# Altium PCB NB3000XN.PcbDoc (part 29 of 71)
Units mil, origin at the board's own origin, x right, y up, seen from the top; angles counter-clockwise.
Board outline 9527.56 x 6929.77 mil, 6 copper layers (Top Layer, GND+SHIELD, MidLayer1, MidLayer2, P2 - 3V3+5V0, Bottom Layer), stack 62.375 mil thick; 832 components, 1027 nets, 4655 pads, 4981 vias.
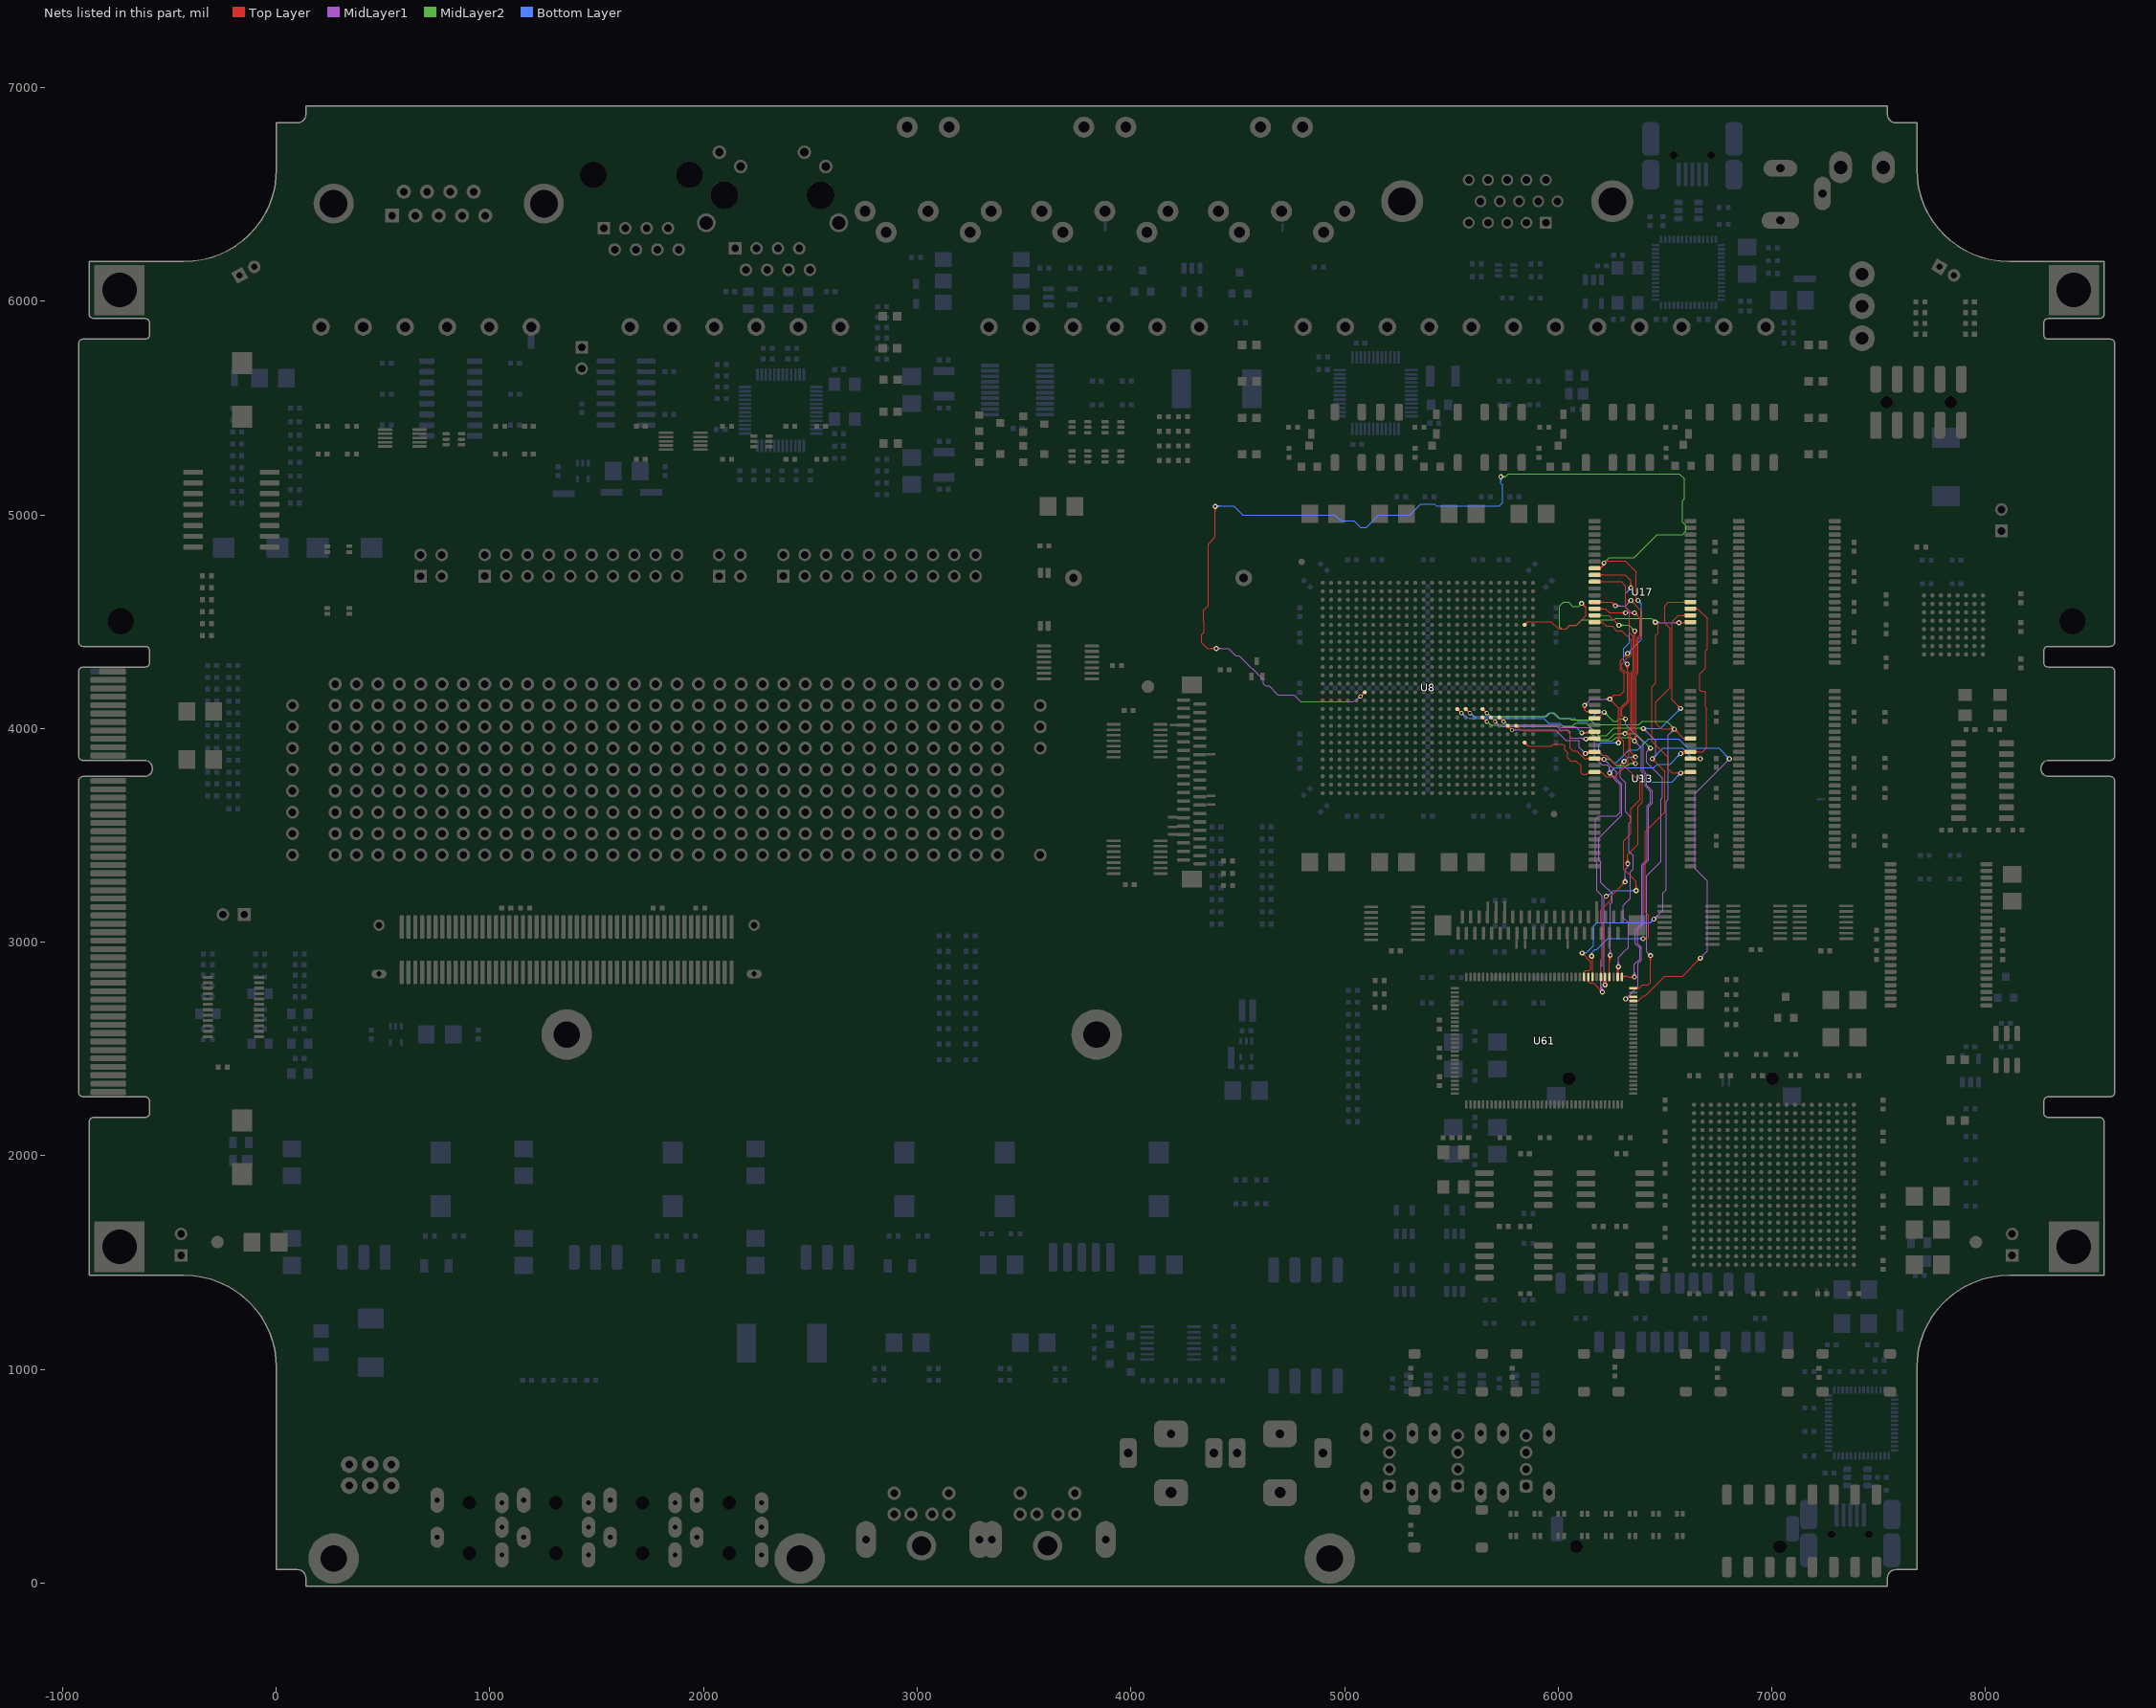
[diagram p33: the nets of this part, all layers, seen from the top]

## Via types
v1: diameter 23, hole 11.81, Top Layer to Bottom Layer, 3672 vias
v2: diameter 26, hole 11.81, Top Layer to Bottom Layer, 461 vias
v3: diameter 19, hole 11.81, Top Layer to Bottom Layer, tented both sides, 396 vias
v4: diameter 23.62, hole 11.81, Top Layer to Bottom Layer, 288 vias
v5: diameter 20, hole 11.81, Top Layer to Bottom Layer, 91 vias
v6: diameter 23, hole 11.81, Top Layer to Bottom Layer, tented both sides, 50 vias
v7: diameter 31, hole 11.81, Top Layer to Bottom Layer, 15 vias
v8: diameter 27.56, hole 11.81, Top Layer to Bottom Layer, tented both sides, 4 vias
v9: diameter 29, hole 11.81, Top Layer to Bottom Layer, 3 vias
v10: diameter 21, hole 11.81, Top Layer to Bottom Layer, 1 vias

## Nets (pads, with @x,y where several pads share a name; then routed paths per layer and width w, separated by ;. In a path a pad name is that pad's centre, name@x,y a point inside that pad or via, vN(x,y) a via of type N, cw(c..) or ccw(c..) an arc to the next point about the centre after c; other vN are vias at no path point) (continued)
DB_MEM.BUS_D17: U8.P6 U13.4 U17.8 U61.61 | length 9838.7
  Top Layer w4: v1@4388.28,5033.28 cw(c4372.06,5017.06) 4395,5017.06 cw(c4417.93,5017.06) v1@4401.72,5033.28 ; v1@4391.11,5036.11 cw(c4381.72,5026.72) 4395,5026.72 cw(c4408.28,5026.72) v1@4398.89,5036.11 ; v4@4393.06,4368.1 ccw(c4376.31,4351.35) 4376.31,4375.04 ccw(c4376.31,4398.73) v4@4393.06,4381.98 ; v1(4395,5040) 4395,4896.1 4362.02,4863.13 4362.02,4577.02 4340,4555 4340,4500.59 4343,4497.59 4343,4451.2 4332.02,4440.23 4332.02,4401.13 4358.11,4375.04 v4(4400,4375.04) ; v4@4395.89,4370.93 ccw(c4385.97,4361.01) 4385.97,4375.04 ccw(c4385.97,4389.07) v4@4395.89,4379.15 ; v3(5075.04,4150.63) U8.P6@5094.72,4170.31 ; U8.P6@5087.22,4170.31 cw(c5069.12,4170.31) 5081.92,4157.51 cw(c5094.72,4144.71) U8.P6@5094.72,4162.81 ; U8.P6@5087.38,4170.31 cw(c5069.66,4170.31) 5082.19,4157.78 cw(c5094.72,4145.25) U8.P6@5094.72,4162.97 ; v1@6117.62,4101.27 cw(c6107.92,4089.04) 6123.52,4089.04 ; v1(6123.52,4108.71) 6123.52,4089.04 ; v1@6129.43,4101.27 ccw(c6139.13,4089.04) 6123.52,4089.04 ; U13.4@6147.37,4074.3 ccw(c6133.72,4060.65) 6133.72,4079.96 ccw(c6133.72,4099.27) U13.4@6147.37,4085.62 ; U13.4@6170.59,4079.96 6132.6,4079.96 6123.52,4089.04 ; U17.8@6170.59,4750.24 6199.72,4750.24 ; U17.8@6187.19,4746.35 ccw(c6190.23,4758.62) 6199.17,4749.68 ; U17.8@6188.15,4750.24 ccw(c6192.22,4766.65) 6204.17,4754.69 ; U17.8@6189.11,4754.12 ccw(c6194.21,4774.67) 6209.18,4759.7 ; U17.8@6190.07,4758 ccw(c6196.2,4782.7) v1@6214.19,4764.71 ; U17.8@6195.63,4747.41 cw(c6199.72,4745.87) 6199.72,4750.24 ; U17.8@6195.63,4753.06 ccw(c6199.72,4754.6) 6199.72,4750.24 ; 6204.89,4755.4 ccw(c6196.85,4763.44) v1@6206.29,4769.76 ; 6208.33,4758.85 ccw(c6200.98,4766.2) v1@6209.62,4771.98 ; 6211.77,4762.29 ccw(c6205.1,4768.96) v1@6212.94,4774.21 ; v1@6241.52,4128.21 cw(c6241.52,4105.27) 6257.74,4121.49 cw(c6273.96,4137.71) 6251.02,4137.71 cw(c6273.96,4137.71) 6257.74,4153.93 cw(c6241.52,4170.14) v1@6241.52,4147.21 ; v1@6241.52,4132.21 cw(c6241.52,4118.93) 6250.91,4128.32 cw(c6260.3,4137.71) 6247.02,4137.71 cw(c6260.3,4137.71) 6250.91,4147.1 cw(c6241.52,4156.49) v1@6241.52,4143.21 ; v1@6275.14,3940.09 ccw(c6258.92,3956.31) 6281.86,3956.31 ccw(c6304.79,3956.31) v1@6288.57,3940.09 ; v1@6277.97,3937.26 ccw(c6268.58,3946.65) 6281.86,3946.65 ccw(c6295.14,3946.65) v1@6285.75,3937.26 ; v1(6281.86,3933.37) 6281.86,4097.37 v1(6241.52,4137.71) 6262.19,4158.37 6290.19,4158.37 6307.86,4176.04 6307.86,4257.37 6290.19,4275.04 6290.19,4316.71 v1(6324.86,4351.37) ; v1@6315.36,4351.37 cw(c6292.42,4351.37) 6308.64,4335.16 cw(c6324.86,4318.94) v1@6324.86,4341.87 ; v1@6319.36,4351.37 cw(c6306.08,4351.37) 6315.47,4341.99 cw(c6324.86,4332.6) v1@6324.86,4345.87 ; U61.61@6351.93,2725.05 6373.53,2725.05 ; U61.61@6368.23,2722.52 cw(c6373.53,2718.22) 6373.53,2725.05 ; U61.61@6368.23,2727.57 ccw(c6373.53,2731.87) 6373.53,2725.05 ; v1(6373.52,4600.04) 6365.19,4608.37 6365.19,4733.71 6313.52,4785.37 6224.52,4785.37 v1(6214.19,4775.04) v1@6214.19,4764.71 ; v1@6655.69,2925.04 cw(c6632.76,2925.04) 6648.97,2908.82 cw(c6665.19,2892.61) v1@6665.19,2915.54 ; v1@6659.69,2925.04 cw(c6646.41,2925.04) 6655.8,2915.65 cw(c6665.19,2906.26) v1@6665.19,2919.54 ; v1(6665.19,2925.04) 6581.86,2841.71 6498.52,2841.71 6406.86,2750.04 6398.52,2750.04 6373.53,2725.05 ; 5087.84,4163.43 cw(c5075.04,4176.24) 5075.04,4158.13 ccw(c5075.04,4176.24) 5087.84,4163.43 ; 5087.84,4163.43 ccw(c5100.65,4150.63) 5082.54,4150.63 cw(c5100.65,4150.63) 5087.84,4163.43 ; 6199.72,4750.24 v1@6214.19,4764.71
  MidLayer1 w4: v4(4400,4375.04) 4456.86,4375.04 4490.19,4341.71 4506.86,4341.71 4620.07,4228.5 4620.07,4209.4 4630.5,4198.97 4646.87,4198.97 4688.29,4157.54 4730,4157.54 4764.33,4157.54 4773.52,4148.35 4795.11,4126.77 4855.26,4126.77 4860,4126.77 4870,4126.77 4918.62,4126.77 4938.04,4126.77 5012.16,4126.77 ; v4@4404.11,4370.93 cw(c4414.03,4361.01) 4414.03,4375.04 cw(c4414.03,4389.07) v4@4404.11,4379.15 ; v4@4406.94,4368.1 cw(c4423.69,4351.35) 4423.69,4375.04 cw(c4423.69,4398.73) v4@4406.94,4381.98 ; 4998.23,4126.77 5012.16,4126.77 ; v3@5067.57,4151.28 cw(c5049.53,4152.86) 5061.17,4138.99 ; v3@5074.39,4143.16 ccw(c5072.81,4125.12) 5061.17,4138.99 ; v1(6123.52,4108.71) 6152.52,4137.71 v1(6241.52,4137.71) ; v1@6123.52,4114.21 ccw(c6123.52,4127.49) 6132.91,4118.1 ccw(c6142.3,4108.71) v1@6129.02,4108.71 ; v1@6123.52,4118.21 ccw(c6123.52,4141.14) 6139.74,4124.93 ccw(c6155.96,4108.71) v1@6133.02,4108.71 ; v1@6234.81,4130.99 ccw(c6218.59,4114.77) 6218.59,4137.71 ccw(c6218.59,4160.64) v1@6234.81,4144.43 ; v1@6237.64,4133.82 ccw(c6228.25,4124.43) 6228.25,4137.71 ccw(c6228.25,4150.99) v1@6237.64,4141.6 ; v1(6665.19,2925.04) 6698.52,2958.37 6698.52,3286.35 6640.19,3344.69 6640.19,3696.71 v1(6801.86,3858.37) ; v1@6665.19,2930.54 ccw(c6665.19,2943.82) 6674.58,2934.43 ccw(c6683.97,2925.04) v1@6670.69,2925.04 ; v1@6665.19,2934.54 ccw(c6665.19,2957.48) 6681.41,2941.26 ccw(c6697.63,2925.04) v1@6674.69,2925.04 ; v1@6792.36,3858.37 cw(c6769.42,3858.37) 6785.64,3842.16 cw(c6801.86,3825.94) v1@6801.86,3848.87 ; v1@6796.36,3858.37 cw(c6783.08,3858.37) 6792.47,3848.99 cw(c6801.86,3839.6) v1@6801.86,3852.87 ; 5012.16,4126.77 5031.66,4126.77 ccw(c5031.66,4168.5) 5061.17,4138.99
  MidLayer2 w4: v1(5731.86,5179.04) 5753.21,5179.04 ; v1@5735.94,5175.36 cw(c5744.22,5167.9) 5744.22,5179.04 cw(c5744.22,5190.18) v1@5735.94,5182.72 ; v1@5738.91,5172.68 cw(c5753.21,5159.8) 5753.21,5179.04 ; v1@5738.91,5185.4 ccw(c5753.21,5198.28) 5753.21,5179.04 ; v1(6214.19,4775.04) 6239.19,4800.04 6356.21,4800.04 6464.54,4908.37 6581.86,4908.37 6598.52,4925.04 6598.52,4950.04 6581.86,4966.71 6581.86,5066.71 6590.19,5075.04 6590.19,5169.08 6567.56,5191.71 5765.88,5191.71 5753.21,5179.04 ; v1@6214.19,4780.54 ccw(c6214.19,4793.82) 6223.58,4784.43 ccw(c6232.97,4775.04) v1@6219.69,4775.04 ; v1@6214.19,4784.54 ccw(c6214.19,4807.48) 6230.41,4791.26 ccw(c6246.63,4775.04) v1@6223.69,4775.04
  Bottom Layer w4: v1(4395,5040) 4385.62,5040 4385.62,5041.71 4481.86,5041.71 4523.52,5000.04 4954.51,5000.04 4954.77,4999.77 ; v1@4398.89,5036.11 cw(c4412.4,5022.6) 4412.4,5041.71 ; v1@4401.72,5033.28 cw(c4422.06,5012.94) 4422.06,5041.71 ; v1@4401.72,5046.72 ccw(c4413.81,5058.81) 4413.81,5041.71 ; 4955,5000 4982.46,4972.54 5044.28,4972.54 5075.94,4940.87 5101.02,4940.87 5160.15,5000 5305.48,5000 5330.52,5025.04 5356.86,5051.37 5420.33,5051.37 5430,5041.71 5723.52,5041.71 5740.19,5058.37 5740.19,5140 5731.86,5148.33 v1(5731.86,5179.04) ; v1@5725.14,5172.32 cw(c5708.92,5156.11) 5731.86,5156.11 cw(c5754.79,5156.11) v1@5738.57,5172.32 ; v1@5727.97,5175.15 cw(c5718.58,5165.76) 5731.86,5165.76 cw(c5745.14,5165.76) v1@5735.75,5175.15 ; v1@6275.14,3926.66 ccw(c6258.92,3910.44) 6258.92,3933.37 ccw(c6258.92,3956.31) v1@6275.14,3940.09 ; v1@6277.97,3929.49 ccw(c6268.58,3920.1) 6268.58,3933.37 ccw(c6268.58,3946.65) v1@6277.97,3937.26 ; v1(6281.86,3933.37) 6198.52,3933.37 6190.19,3925.04 6190.19,3891.71 6206.86,3875.04 6223.52,3875.04 6257.02,3841.54 6272.44,3841.54 6330.27,3899.37 6371.48,3899.37 6422.82,3950.71 6564.52,3950.71 6606.86,3908.37 6751.86,3908.37 v1(6801.86,3858.37) ; v1(6324.86,4351.37) 6390.19,4416.71 6390.19,4583.37 v1(6373.52,4600.04) ; v1@6324.86,4356.87 ccw(c6324.86,4370.15) 6334.25,4360.76 ccw(c6343.64,4351.37) v1@6330.36,4351.37 ; v1@6324.86,4360.87 ccw(c6324.86,4383.81) 6341.07,4367.59 ccw(c6357.29,4351.37) v1@6334.36,4351.37 ; v1@6373.52,4590.54 cw(c6373.52,4567.61) 6389.74,4583.82 cw(c6405.96,4600.04) v1@6383.02,4600.04 ; v1@6373.52,4594.54 cw(c6373.52,4581.26) 6382.91,4590.65 cw(c6392.3,4600.04) v1@6379.02,4600.04 ; v1@6792.36,3858.37 ccw(c6769.42,3858.37) 6785.64,3874.59 ccw(c6801.86,3890.81) v1@6801.86,3867.87 ; v1@6796.36,3858.37 ccw(c6783.08,3858.37) 6792.47,3867.76 ccw(c6801.86,3877.15) v1@6801.86,3863.87
DB_MEM.BUS_D18: U8.T18 U13.5 U17.9 U61.62 | length 3809.3
  Top Layer w4: U8.T18@5567.17,4084.07 cw(c5567.17,4065.97) 5579.97,4078.77 cw(c5592.77,4091.57) U8.T18@5574.67,4091.57 ; U8.T18@5567.17,4084.23 cw(c5567.17,4066.51) 5579.7,4079.04 cw(c5592.23,4091.57) U8.T18@5574.51,4091.57 ; U8.T18@5567.17,4091.57 v3(5586.85,4071.89) ; U13.5@6170.59,4048.46 6198.15,4048.46 6200.15,4050.46 6200.15,4061.33 v1(6215.19,4076.37) ; U17.9@6170.59,4718.74 6313.16,4718.74 6340.19,4691.71 v1(6340.19,4658.37) ; U17.9@6193.81,4713.08 cw(c6207.46,4699.43) 6207.46,4718.74 cw(c6207.46,4738.05) U17.9@6193.81,4724.4 ; v1(6315,4045) 6298.19,4061.81 6298.19,4093.06 6331.86,4126.73 6331.86,4260 6323.52,4268.33 v1(6323.52,4301.71) ; v1(6315.52,2734.37) 6319.64,2734.37 6330,2744.73 ; v1@6316.81,4294.99 cw(c6300.59,4278.77) 6323.52,4278.77 cw(c6346.46,4278.77) v1@6330.24,4294.99 ; v1@6319.64,4297.82 cw(c6310.25,4288.43) 6323.52,4288.43 cw(c6336.8,4288.43) v1@6327.41,4297.82 ; v1@6333.47,4665.09 ccw(c6317.26,4681.31) 6340.19,4681.31 ccw(c6363.13,4681.31) v1@6346.91,4665.09 ; U61.62@6335.71,2742.12 ccw(c6330,2737.18) 6330,2744.73 ; U61.62@6335.71,2747.35 cw(c6330,2752.28) 6330,2744.73 ; v1@6336.3,4662.26 ccw(c6326.91,4671.65) 6340.19,4671.65 ccw(c6353.47,4671.65) v1@6344.08,4662.26 ; U61.62@6351.93,2744.73 6330,2744.73 ; 5574.05,4084.69 cw(c5561.24,4071.89) 5579.35,4071.89 ccw(c5561.24,4071.89) 5574.05,4084.69 ; 5574.05,4084.69 ccw(c5586.85,4097.5) 5586.85,4079.39 cw(c5586.85,4097.5) 5574.05,4084.69
  MidLayer1 w4: v1@6315.19,4044.81 6315.19,4018.04 6398.52,3934.71 6398.52,3803.04 6415.19,3786.37 6415.19,3734.04 6440.86,3708.37 6440.86,3651.37 6423.52,3634.04 6423.52,3384.37 6398.86,3359.71 6398.86,3085.06 6371.19,3057.39 6371.19,2994.04 6390.19,2975.04 6390.19,2916.71 6374.86,2901.37 6374.86,2793.71 v1(6315.52,2734.37) ; v1@6315.52,2739.87 ccw(c6315.52,2753.15) 6324.91,2743.76 ccw(c6334.3,2734.37) v1@6321.02,2734.37 ; v1@6315.52,2743.87 ccw(c6315.52,2766.81) 6331.74,2750.59 ccw(c6347.96,2734.37) v1@6325.02,2734.37
  MidLayer2 w4: v1@6215.19,4066.87 cw(c6215.19,4043.94) 6231.41,4060.16 cw(c6247.63,4076.37) v1@6224.69,4076.37 ; v1@6215.19,4070.87 cw(c6215.19,4057.6) 6224.58,4066.99 cw(c6233.97,4076.37) v1@6220.69,4076.37 ; v1(6215.19,4076.37) 6256.56,4035 6275,4035 6284.81,4044.81 v1@6315.19,4044.81
  Bottom Layer w4: v3@5587.5,4064.42 cw(c5589.08,4046.38) 5600.72,4060.25 cw(c5612.36,4074.12) v3@5594.32,4072.54 ; 5600.43,4060.5 ccw(c5610.36,4070.43) 5610.36,4056.38 5703.9,4056.38 5910,4056.38 5920,4056.38 5924.74,4056.38 5938.41,4056.38 5954.52,4072.5 5976.19,4072.5 5997.19,4051.5 5997.19,4051.37 5999.86,4048.71 6076.88,4048.71 6092.21,4033.37 6140.19,4033.37 6183.19,4076.37 v1(6215.19,4076.37) ; v1@6208.47,4069.66 ccw(c6192.26,4053.44) 6192.26,4076.37 ccw(c6192.26,4099.31) v1@6208.47,4083.09 ; v1@6211.3,4072.49 ccw(c6201.91,4063.1) 6201.91,4076.37 ccw(c6201.91,4089.65) v1@6211.3,4080.26 ; v1@6314.02,4301.71 ccw(c6291.09,4301.71) 6307.31,4317.93 ccw(c6323.52,4334.14) v1@6323.52,4311.21 ; v1@6318.02,4301.71 ccw(c6304.75,4301.71) 6314.14,4311.1 ccw(c6323.52,4320.49) v1@6323.52,4307.21 ; v1(6323.52,4301.71) 6306.86,4318.37 6306.86,4374.71 6332.86,4400.71 6332.86,4549.04 6315.19,4566.71 6315.19,4633.37 v1(6340.19,4658.37) ; v1@6330.69,4658.37 cw(c6307.76,4658.37) 6323.97,4642.16 cw(c6340.19,4625.94) v1@6340.19,4648.87 ; v1@6334.69,4658.37 cw(c6321.41,4658.37) 6330.8,4648.99 cw(c6340.19,4639.6) v1@6340.19,4652.87
DB_MEM.BUS_D19: U8.T17 U13.7 U17.10 U61.64 | length 3878.3
  Top Layer w4: U8.T17@5527.8,4084.07 cw(c5527.8,4065.97) 5540.6,4078.77 cw(c5553.4,4091.57) U8.T17@5535.3,4091.57 ; U8.T17@5527.8,4084.23 cw(c5527.8,4066.51) 5540.33,4079.04 cw(c5552.86,4091.57) U8.T17@5535.14,4091.57 ; U8.T17@5527.8,4091.57 v3(5547.48,4071.89) ; v1(6110,3980) 6129.53,3980 ; v1@6117.47,3974.14 cw(c6129.53,3964.68) 6129.53,3980 ; v1@6117.47,3985.86 ccw(c6129.53,3995.32) 6129.53,3980 ; U13.7@6147.1,3980.1 ccw(c6135,3969.15) 6135,3985.47 ; U13.7@6147.1,3990.84 cw(c6135,4001.79) 6135,3985.47 ; U13.7@6170.59,3985.47 6135,3985.47 ; U17.10@6170.59,4687.24 6294.66,4687.24 6315.19,4666.71 6315.19,4566.71 6332.86,4549.04 6332.86,4449.04 6350.52,4431.37 6350.52,4270.65 6339.86,4259.98 6339.86,4003.71 v1(6312.86,3976.71) ; U17.10@6193.81,4681.59 cw(c6207.46,4667.93) 6207.46,4687.24 cw(c6207.46,4706.56) U17.10@6193.81,4692.9 ; v1@6312.86,3982.21 ccw(c6312.86,3995.49) 6322.25,3986.1 ccw(c6331.64,3976.71) v1@6318.36,3976.71 ; v1@6312.86,3986.21 ccw(c6312.86,4009.14) 6329.07,3992.93 ccw(c6345.29,3976.71) v1@6322.36,3976.71 ; U61.64@6351.93,2784.1 6377.52,2784.1 6394.8,2801.37 6421.37,2801.37 6431.86,2811.86 v1(6431.86,2937.37) ; U61.64@6367.96,2781.27 cw(c6374.78,2774.44) 6374.78,2784.1 cw(c6374.78,2793.76) U61.64@6367.96,2786.93 ; v1@6425.14,2930.66 cw(c6408.92,2914.44) 6431.86,2914.44 cw(c6454.79,2914.44) v1@6438.57,2930.66 ; v1@6427.97,2933.49 cw(c6418.58,2924.1) 6431.86,2924.1 cw(c6445.14,2924.1) v1@6435.75,2933.49 ; 5534.68,4084.69 cw(c5521.87,4071.89) 5539.98,4071.89 ccw(c5521.87,4071.89) 5534.68,4084.69 ; 5534.68,4084.69 ccw(c5547.48,4097.5) 5547.48,4079.39 cw(c5547.48,4097.5) 5534.68,4084.69 ; 6129.53,3980 6135,3985.47
  MidLayer1 w4: v1@6422.36,2937.37 ccw(c6399.42,2937.37) 6415.64,2953.59 ccw(c6431.86,2969.81) v1@6431.86,2946.87 ; v1@6422.36,3908.37 cw(c6399.42,3908.37) 6415.64,3892.16 cw(c6431.86,3875.94) v1@6431.86,3898.87 ; v1@6426.36,2937.37 ccw(c6413.08,2937.37) 6422.47,2946.76 ccw(c6431.86,2956.15) v1@6431.86,2942.87 ; v1@6426.36,3908.37 cw(c6413.08,3908.37) 6422.47,3898.99 cw(c6431.86,3889.6) v1@6431.86,3902.87 ; v1(6431.86,2937.37) 6414.86,2954.37 6414.86,3311.36 6481.86,3378.36 6481.86,3669.69 6489.19,3677.02 6489.19,3767.71 6415.19,3841.71 6415.19,3891.71 v1(6431.86,3908.37)
  MidLayer2 w4: v1(6110,3980) 6150.56,3980 6180.52,3950.04 6237.19,3950.04 6263.86,3976.71 v1(6312.86,3976.71) 6363.52,3976.71 6385.4,3954.83 v1(6431.86,3908.37) ; v1@6113.89,3976.11 cw(c6123.28,3966.72) 6123.28,3980 cw(c6123.28,3993.28) v1@6113.89,3983.89 ; v1@6116.72,3973.28 cw(c6132.93,3957.06) 6132.93,3980 cw(c6132.93,4002.93) v1@6116.72,3986.72 ; v1@6306.14,3969.99 ccw(c6289.92,3953.77) 6289.92,3976.71 ccw(c6289.92,3999.64) v1@6306.14,3983.43 ; v1@6308.97,3972.82 ccw(c6299.58,3963.43) 6299.58,3976.71 ccw(c6299.58,3989.99) v1@6308.97,3980.6 ; v1@6316.75,3972.82 cw(c6326.14,3963.43) 6326.14,3976.71 cw(c6326.14,3989.99) v1@6316.75,3980.6 ; v1@6319.57,3969.99 cw(c6335.79,3953.77) 6335.79,3976.71 cw(c6335.79,3999.64) v1@6319.57,3983.43 ; v1@6422.36,3908.37 ccw(c6399.42,3908.37) 6415.64,3924.59 ccw(c6431.86,3940.81) v1@6431.86,3917.87 ; v1@6426.36,3908.37 ccw(c6413.08,3908.37) 6422.47,3917.76 ccw(c6431.86,3927.15) v1@6431.86,3913.87
  Bottom Layer w4: v3@5548.13,4064.42 cw(c5549.71,4046.38) 5561.35,4060.25 ; v3@5554.95,4072.54 ccw(c5572.99,4074.12) 5561.35,4060.25 ; v1(6110,3980) 6081.29,4008.71 6023.19,4008.71 6006.86,4025.04 5954.84,4025.04 5931.86,4048.03 5924.74,4048.03 5920,4048.03 5910,4048.03 5703.9,4048.03 5684.48,4048.03 5610.36,4048.03 5590.86,4048.03 cw(c5590.86,4089.76) 5561.35,4060.25
DB_MEM.BUS_D20: U8.U21 U13.8 U17.13 U61.65 | length 3875
  Top Layer w4: U8.U21@5685.28,4044.7 cw(c5685.28,4026.6) 5698.08,4039.4 cw(c5710.88,4052.2) U8.U21@5692.78,4052.2 ; U8.U21@5685.28,4044.86 cw(c5685.28,4027.14) 5697.81,4039.67 cw(c5710.34,4052.2) U8.U21@5692.62,4052.2 ; U8.U21@5685.28,4052.2 v3(5704.96,4032.52) ; v1@6130.36,3953.98 U13.8@6170.59,3953.98 ; v1@6131.43,3949.81 cw(c6141.49,3939.74) 6141.49,3953.98 ; v1@6134.25,3946.98 cw(c6151.15,3930.08) U13.8@6151.15,3953.98 ; v1@6137.08,3944.15 cw(c6160.8,3920.43) U13.8@6160.8,3953.98 ; v1@6137.08,3957.58 ccw(c6145.8,3966.3) U13.8@6145.8,3953.98 ; U13.8@6147.37,3948.32 ccw(c6133.72,3934.66) 6133.72,3953.98 ccw(c6133.72,3973.29) U13.8@6147.37,3959.63 ; U17.13@6170.59,4592.76 6249.81,4592.76 v1(6267.52,4575.04) ; U17.13@6193.81,4587.1 cw(c6207.46,4573.44) 6207.46,4592.76 cw(c6207.46,4612.07) U17.13@6193.81,4598.41 ; v1@6258.02,4575.04 ccw(c6235.09,4575.04) 6251.31,4591.26 ccw(c6267.52,4607.48) v1@6267.52,4584.54 ; v1@6262.02,4575.04 ccw(c6248.75,4575.04) 6258.14,4584.43 ccw(c6267.52,4593.82) v1@6267.52,4580.54 ; U61.65@6298.34,2837.34 cw(c6308.9,2826.79) 6308.9,2841.71 ; U61.65@6298.35,2841.71 6325,2841.71 6329.33,2837.37 v1(6356.86,2837.37) ; U61.65@6301.17,2834.51 cw(c6318.55,2817.13) 6318.55,2841.71 ; v1@6340.19,4590.54 cw(c6340.19,4567.61) 6356.41,4583.82 cw(c6372.63,4600.04) v1@6349.69,4600.04 ; v1@6340.19,4594.54 cw(c6340.19,4581.26) 6349.58,4590.65 cw(c6358.97,4600.04) v1@6345.69,4600.04 ; v1(6340.19,4600.04) 6390.19,4550.04 6390.19,4434.02 6374.52,4418.35 6374.52,4260.71 6363.86,4250.04 6363.86,3948.71 v1(6356.86,3941.71) ; v1@6350.14,2830.66 ccw(c6333.92,2814.44) 6333.92,2837.37 ccw(c6333.92,2860.31) v1@6350.14,2844.09 ; v1@6350.14,3948.43 ccw(c6317.02,3981.54) 6363.86,3981.54 ; v1@6352.97,2833.49 ccw(c6343.58,2824.1) 6343.58,2837.37 ccw(c6343.58,2850.65) v1@6352.97,2841.26 ; v1@6352.97,3945.6 ccw(c6326.68,3971.89) 6363.86,3971.89 ; v1@6355.8,3942.77 ccw(c6336.34,3962.23) 6363.86,3962.23 ; v1@6358.62,3939.94 ccw(c6345.99,3952.57) 6363.86,3952.57 ; 5692.16,4045.32 cw(c5679.35,4032.52) 5697.46,4032.52 ccw(c5679.35,4032.52) 5692.16,4045.32 ; 5692.16,4045.32 ccw(c5704.96,4058.13) 5704.96,4040.02 cw(c5704.96,4058.13) 5692.16,4045.32
  MidLayer1 w4: v3@5705.61,4025.05 cw(c5707.19,4007.01) 5718.83,4020.88 ; v3@5712.43,4033.17 ccw(c5730.47,4034.75) 5718.83,4020.88 ; 6097.45,3955 cw(c6097.45,3917.96) v1@6123.65,3944.15 ; 6107.11,3955 cw(c6107.11,3927.61) v1@6126.48,3946.98 ; 6116.77,3955 cw(c6116.77,3937.27) v1@6129.3,3949.81 ; 6117.41,3955 ccw(c6117.41,3963.83) v1@6123.65,3957.58 ; v1(6130.36,3950.87) 6126.23,3955 6060,3955 6055,3960 6055,3985 6045,3995 6008.69,3995 5995.03,4008.66 5920,4008.66 5910,4008.66 5861.38,4008.66 5841.96,4008.66 5767.84,4008.66 5748.34,4008.66 cw(c5748.34,4050.39) 5718.83,4020.88 ; v1(6267.52,4575.04) 6315.19,4575.04 v1(6340.19,4600.04) ; v1@6271.41,4571.15 cw(c6280.8,4561.76) 6280.8,4575.04 cw(c6280.8,4588.32) v1@6271.41,4578.93 ; v1@6274.24,4568.32 cw(c6290.46,4552.11) 6290.46,4575.04 cw(c6290.46,4597.98) v1@6274.24,4581.76 ; v1@6330.69,4600.04 cw(c6307.76,4600.04) 6323.97,4583.82 cw(c6340.19,4567.61) v1@6340.19,4590.54 ; v1@6334.69,4600.04 cw(c6321.41,4600.04) 6330.8,4590.65 cw(c6340.19,4581.26) v1@6340.19,4594.54 ; v1@6350.14,2844.09 ccw(c6333.92,2860.31) 6356.86,2860.31 ccw(c6379.79,2860.31) v1@6363.57,2844.09 ; v1@6352.97,2841.26 ccw(c6343.58,2850.65) 6356.86,2850.65 ccw(c6370.14,2850.65) v1@6360.75,2841.26 ; v1(6356.86,2837.37) 6356.86,2896.04 6381.86,2921.04 6381.86,2972.06 6361.52,2992.39 6361.52,3059.04 6390.86,3088.37 6390.86,3363.02 6415.52,3387.69 6415.52,3637.36 6432.86,3654.69 6432.86,3705.06 6406.86,3731.06 6406.86,3783.37 6390.19,3800.04 6390.19,3908.37 v1(6356.86,3941.71) ; v1@6356.86,3932.21 cw(c6356.86,3909.27) 6373.07,3925.49 cw(c6389.29,3941.71) v1@6366.36,3941.71 ; v1@6356.86,3936.21 cw(c6356.86,3922.93) 6366.25,3932.32 cw(c6375.64,3941.71) v1@6362.36,3941.71
  MidLayer2 w4: v1(6130.36,3950.87) 6168.38,3950.87 6177.54,3941.71 6252.52,3941.71 6269.86,3959.04 6339.52,3959.04 v1(6356.86,3941.71) ; v1@6134.25,3946.98 cw(c6143.64,3937.59) 6143.64,3950.87 cw(c6143.64,3964.15) v1@6134.25,3954.76 ; v1@6137.08,3944.15 cw(c6153.3,3927.93) 6153.3,3950.87 cw(c6153.3,3973.8) v1@6137.08,3957.58 ; v1@6347.36,3941.71 ccw(c6324.42,3941.71) 6340.64,3957.93 ccw(c6356.86,3974.14) v1@6356.86,3951.21 ; v1@6351.36,3941.71 ccw(c6338.08,3941.71) 6347.47,3951.1 ccw(c6356.86,3960.49) v1@6356.86,3947.21
DB_MEM.BUS_D21: U8.V23 U13.10 U17.14 U61.66 | length 3740.1
  Top Layer w4: U8.V23@5764.02,4005.33 cw(c5764.02,3987.23) 5776.82,4000.03 cw(c5789.62,4012.83) U8.V23@5771.52,4012.83 ; U8.V23@5764.02,4005.49 cw(c5764.02,3987.77) 5776.55,4000.3 cw(c5789.08,4012.83) U8.V23@5771.36,4012.83 ; U8.V23@5764.02,4012.83 v3(5783.7,3993.15) ; v1@6125.76,3885.14 cw(c6139.86,3871.04) 6139.86,3890.98 ; v1(6127.52,3883.37) v1@6135.13,3890.98 ; v1@6128.58,3882.31 cw(c6149.52,3861.38) U13.10@6149.52,3890.98 ; v1@6131.41,3879.49 cw(c6159.17,3851.73) U13.10@6159.17,3890.98 ; v1@6134.24,3876.66 cw(c6168.83,3842.07) U13.10@6168.83,3890.98 ; U13.10@6147.07,3885.65 ccw(c6135.13,3874.96) v1@6135.13,3890.98 ; U13.10@6147.07,3896.32 cw(c6135.13,3907) v1@6135.13,3890.98 ; U17.14@6170.59,4561.26 6220.64,4561.26 6240.19,4541.71 v1(6315.19,4541.71) ; U13.10@6188.15,3882.98 cw(c6188.15,3857) 6206.53,3875.37 ; U13.10@6188.15,3886.98 cw(c6188.15,3870.65) 6199.7,3882.2 ; U17.14@6193.81,4555.6 cw(c6207.46,4541.95) 6207.46,4561.26 cw(c6207.46,4580.57) U17.14@6193.81,4566.92 ; U13.10@6196.15,3890.98 ccw(c6208.79,3890.98) 6199.85,3882.05 ; v1@6275.14,2878.32 cw(c6266.64,2869.82) 6278.66,2869.82 ; U61.66@6275.83,2853.36 ccw(c6269,2860.19) 6278.66,2860.19 ccw(c6288.32,2860.19) U61.66@6281.49,2853.36 ; U61.66@6278.66,2837.34 v1@6278.66,2881.84 ; U61.66@6278.66,2854.39 cw(c6312.51,2854.39) v1@6288.57,2878.32 ; 6278.66,2864.04 cw(c6302.85,2864.04) v1@6285.75,2881.15 ; 6278.66,2873.7 cw(c6293.2,2873.7) v1@6282.92,2883.98 ; v1(6308.19,3846.04) 6295.52,3833.37 6265.19,3833.37 6223.52,3875.04 6206.86,3875.04 6190.91,3890.98 U13.10@6170.59,3890.98 v1@6135.13,3890.98 ; v1@6308.47,4534.99 ccw(c6292.26,4518.77) 6292.26,4541.71 ccw(c6292.26,4564.64) v1@6308.47,4548.43 ; v1@6311.3,4537.82 ccw(c6301.91,4528.43) 6301.91,4541.71 ccw(c6301.91,4554.99) v1@6311.3,4545.6 ; v1@6352.69,3866.71 ccw(c6329.76,3866.71) 6345.97,3882.93 ccw(c6362.19,3899.14) v1@6362.19,3876.21 ; v1@6356.69,3866.71 ccw(c6343.41,3866.71) 6352.8,3876.1 ccw(c6362.19,3885.49) v1@6362.19,3872.21 ; v1@6356.86,4532.21 cw(c6356.86,4509.27) 6373.07,4525.49 cw(c6389.29,4541.71) v1@6366.36,4541.71 ; v1@6356.86,4536.21 cw(c6356.86,4522.93) 6366.25,4532.32 cw(c6375.64,4541.71) v1@6362.36,4541.71 ; v1(6356.86,4541.71) 6381.86,4516.71 6381.86,4437 6366.52,4421.67 6366.52,4264.02 6355.86,4253.35 6355.86,3990.04 6338.86,3973.04 6338.86,3890.04 v1(6362.19,3866.71) ; 5770.9,4005.95 cw(c5758.09,3993.15) 5776.2,3993.15 ccw(c5758.09,3993.15) 5770.9,4005.95 ; 5770.9,4005.95 ccw(c5783.7,4018.76) 5783.7,4000.65 cw(c5783.7,4018.76) 5770.9,4005.95
  MidLayer1 w4: v3(5783.7,3993.15) 5861.38,3993.15 5910,3993.15 5920,3993.15 5986.23,3993.15 6035,3944.37 6096.86,3944.37 6099.52,3941.71 6099.52,3911.37 v1(6127.52,3883.37) ; v3@5788.89,3987.96 cw(c5801.43,3975.42) 5801.43,3993.15 cw(c5801.43,4010.88) v3@5788.89,3998.34 ; v3@5789,3987.85 cw(c5801.81,3975.04) 5801.81,3993.15 cw(c5801.81,4011.26) v3@5789,3998.45 ; v1@6118.02,3883.37 ccw(c6095.09,3883.37) 6111.31,3899.59 ccw(c6127.52,3915.81) v1@6127.52,3892.87 ; v1@6122.02,3883.37 ccw(c6108.75,3883.37) 6118.14,3892.76 ccw(c6127.52,3902.15) v1@6127.52,3888.87 ; v1@6275.14,2891.76 ccw(c6258.92,2907.98) 6281.86,2907.98 ccw(c6304.79,2907.98) v1@6288.57,2891.76 ; v1@6277.97,2888.93 ccw(c6268.58,2898.32) 6281.86,2898.32 ccw(c6295.14,2898.32) v1@6285.75,2888.93 ; v1(6281.86,2885.04) 6281.86,2928.39 6310,2956.54 6329.52,2976.04 6329.52,3090.69 6305.19,3115.02 6305.19,3171.73 6338.86,3205.39 6338.86,3329.37 6351.19,3341.71 6351.19,3405.71 6331.86,3425.04 6331.86,3558.37 6340.19,3566.71 6340.19,3585 6314.86,3610.33 6314.86,3745.33 6290.19,3770 6290.19,3828.04 v1(6308.19,3846.04) ; v1@6298.69,3846.04 cw(c6275.76,3846.04) 6291.97,3829.82 cw(c6308.19,3813.61) v1@6308.19,3836.54 ; v1@6302.69,3846.04 cw(c6289.41,3846.04) 6298.8,3836.65 cw(c6308.19,3827.26) v1@6308.19,3840.54 ; v1(6315.19,4541.71) v1(6356.86,4541.71) ; v1@6319.08,4537.82 cw(c6328.47,4528.43) 6328.47,4541.71 cw(c6328.47,4554.99) v1@6319.08,4545.6 ; v1@6321.91,4534.99 cw(c6338.13,4518.77) 6338.13,4541.71 cw(c6338.13,4564.64) v1@6321.91,4548.43 ; v1@6350.14,4534.99 ccw(c6333.92,4518.77) 6333.92,4541.71 ccw(c6333.92,4564.64) v1@6350.14,4548.43 ; v1@6352.97,4537.82 ccw(c6343.58,4528.43) 6343.58,4541.71 ccw(c6343.58,4554.99) v1@6352.97,4545.6
  Bottom Layer w4: v1(6308.19,3846.04) 6328.86,3866.71 v1(6362.19,3866.71) ; v1@6308.19,3851.54 ccw(c6308.19,3864.82) 6317.58,3855.43 ccw(c6326.97,3846.04) v1@6313.69,3846.04 ; v1@6308.19,3855.54 ccw(c6308.19,3878.48) 6324.41,3862.26 ccw(c6340.63,3846.04) v1@6317.69,3846.04 ; v1@6355.47,3859.99 ccw(c6339.26,3843.77) 6339.26,3866.71 ccw(c6339.26,3889.64) v1@6355.47,3873.43 ; v1@6358.3,3862.82 ccw(c6348.91,3853.43) 6348.91,3866.71 ccw(c6348.91,3879.99) v1@6358.3,3870.6
DB_MEM.BUS_D22: U8.V24 U13.11 U17.15 U61.68 | length 3430.7
  Top Layer w4: U8.V24@5803.39,4005.49 cw(c5803.39,3987.77) 5815.92,4000.3 ; U8.V24@5810.73,4012.83 ccw(c5828.45,4012.83) 5815.92,4000.3 ; U13.11@6147.37,3853.83 ccw(c6133.72,3840.18) 6133.72,3859.49 ccw(c6133.72,3878.8) U13.11@6147.37,3865.15 ; U17.15@6170.59,4529.76 6238.14,4529.76 v1(6284.52,4483.37) ; U13.11@6183.74,3859.49 cw(c6183.74,3825.92) v1@6207.47,3849.66 ; U13.11@6193.4,3859.49 cw(c6193.4,3835.58) v1@6210.3,3852.49 ; U17.15@6193.81,4524.11 cw(c6207.46,4510.45) 6207.46,4529.76 cw(c6207.46,4549.08) U17.15@6193.81,4535.42 ; U13.11@6194.73,3854.94 cw(c6203.41,3848.93) v1@6203.41,3859.49 ; U13.11@6194.73,3864.04 ccw(c6203.41,3870.04) v1@6203.41,3859.49 ; 6198.77,3859.49 ccw(c6198.77,3871.79) v1@6207.47,3863.09 ; 6203.05,3859.49 cw(c6203.05,3845.24) v1@6213.13,3855.31 ; v1(6214.19,3856.37) 6206.52,3856.37 v1@6203.41,3859.49 ; U61.68@6236.46,2853.36 ccw(c6229.63,2860.19) 6239.29,2860.19 ccw(c6248.95,2860.19) U61.68@6242.12,2853.36 ; v1@6236.81,2931.99 cw(c6230.81,2925.99) 6239.29,2925.99 ; U61.68@6239.29,2837.34 6239.29,2934.47 v1(6243.52,2938.71) ; 6239.29,2905.55 cw(c6276.68,2905.55) v1@6250.24,2931.99 ; 6239.29,2915.21 cw(c6267.02,2915.21) v1@6247.41,2934.82 ; 6239.29,2924.86 cw(c6257.37,2924.86) v1@6244.58,2937.65 ; v1@6275.02,4483.37 ccw(c6252.09,4483.37) 6268.31,4499.59 ccw(c6284.52,4515.81) v1@6284.52,4492.87 ; v1@6279.02,4483.37 ccw(c6265.75,4483.37) 6275.14,4492.76 ccw(c6284.52,4502.15) v1@6284.52,4488.87 ; v1@6351.81,4449.99 cw(c6335.59,4433.77) 6358.52,4433.77 cw(c6381.46,4433.77) v1@6365.24,4449.99 ; v1@6352.69,3836.37 ccw(c6329.76,3836.37) 6345.97,3852.59 ccw(c6362.19,3868.81) v1@6362.19,3845.87 ; v1@6354.64,4452.82 cw(c6345.25,4443.43) 6358.52,4443.43 cw(c6371.8,4443.43) v1@6362.41,4452.82 ; v1@6356.69,3836.37 ccw(c6343.41,3836.37) 6352.8,3845.76 ccw(c6362.19,3855.15) v1@6362.19,3841.87 ; v1(6358.52,4456.71) 6358.52,4267.34 6347.86,4256.67 6347.86,3995.37 6330.86,3978.37 6330.86,3867.71 v1(6362.19,3836.37) ; 5815.92,4000.3 ccw(c5843.27,4027.65) 5843.27,3988.97 5910,3988.97 5920,3988.97 5924.74,3988.97 6020.26,3988.97 6024,3992.71 6039.19,3992.71 6055.52,3976.37 6056.02,3975.87 6056.02,3909.46 6070.11,3895.37 6086.52,3895.37 6122.19,3859.71 6122.19,3859.49 v1@6203.41,3859.49
  MidLayer1 w4: v1@6214.19,3846.87 cw(c6214.19,3823.94) 6230.41,3840.16 cw(c6246.63,3856.37) v1@6223.69,3856.37 ; v1@6214.19,3850.87 cw(c6214.19,3837.6) 6223.58,3846.99 cw(c6232.97,3856.37) v1@6219.69,3856.37 ; v1(6214.19,3856.37) 6255.13,3815.44 6273.52,3797.06 6273.52,3764.04 6298.52,3739.04 6298.52,3595.71 6190.19,3487.37 6190.19,3383.37 6198.52,3375.04 6198.52,3305 6198.52,3283.37 6198.52,3280.69 6251.94,3227.28 6251.94,3186.79 6243.52,3178.37 v1(6243.52,2938.71) ; v1@6236.81,2945.43 ccw(c6220.59,2961.64) 6243.52,2961.64 ccw(c6266.46,2961.64) v1@6250.24,2945.43 ; v1@6239.64,2942.6 ccw(c6230.25,2951.99) 6243.52,2951.99 ccw(c6256.8,2951.99) v1@6247.41,2942.6
  MidLayer2 w4: v1(6214.19,3856.37) 6242.19,3856.37 6273.52,3825.04 6325,3825.04 6336.33,3836.37 v1(6362.19,3836.37) ; v1@6218.08,3852.49 cw(c6227.47,3843.1) 6227.47,3856.37 cw(c6227.47,3869.65) v1@6218.08,3860.26 ; v1@6220.91,3849.66 cw(c6237.13,3833.44) 6237.13,3856.37 cw(c6237.13,3879.31) v1@6220.91,3863.09 ; v1(6284.52,4483.37) 6331.86,4483.37 v1(6358.52,4456.71) ; v1@6288.41,4479.49 cw(c6297.8,4470.1) 6297.8,4483.37 cw(c6297.8,4496.65) v1@6288.41,4487.26 ; v1@6291.24,4476.66 cw(c6307.46,4460.44) 6307.46,4483.37 cw(c6307.46,4506.31) v1@6291.24,4490.09 ; v1@6349.02,4456.71 ccw(c6326.09,4456.71) 6342.31,4472.93 ccw(c6358.52,4489.14) v1@6358.52,4466.21 ; v1@6353.02,4456.71 ccw(c6339.75,4456.71) 6349.14,4466.1 ccw(c6358.52,4475.49) v1@6358.52,4462.21 ; v1@6355.47,3829.66 ccw(c6339.26,3813.44) 6339.26,3836.37 ccw(c6339.26,3859.31) v1@6355.47,3843.09 ; v1@6358.3,3832.49 ccw(c6348.91,3823.1) 6348.91,3836.37 ccw(c6348.91,3849.65) v1@6358.3,3840.26
DB_MEM.BUS_D23: U8.Y25 U13.13 U17.16 U61.69 | length 3222.3
  Top Layer w4: 6134.47,3786.47 cw(c6149.58,3771.36) U13.13@6152.49,3792.53 ; 6140.17,3792.17 cw(c6150.96,3781.38) U13.13@6153.03,3796.5 ; U13.13@6156.86,3796.5 U13.13@6170.59,3796.5 ; U17.16@6170.59,4498.27 6206.15,4498.27 ; U17.16@6194.09,4492.91 cw(c6206.15,4482.02) 6206.15,4498.27 ; U17.16@6194.09,4503.63 ccw(c6206.15,4514.52) 6206.15,4498.27 ; U13.13@6195.06,3792.47 cw(c6202.07,3788.39) 6202.07,3796.5 ; U13.13@6195.06,3800.52 ccw(c6202.07,3804.6) 6202.07,3796.5 ; v1@6212.47,2806.76 ccw(c6195.25,2823.98) U61.69@6219.6,2823.98 ; v1@6215.19,2804.04 v1(6219.19,2800.04) 6219.6,2800.46 U61.69@6219.6,2837.34 ; v1@6215.3,2803.93 ccw(c6204.91,2814.32) 6219.6,2814.32 ; U61.69@6216.78,2821.32 cw(c6209.95,2814.49) 6219.6,2814.49 cw(c6229.26,2814.49) U61.69@6222.43,2821.32 ; 6219.6,2812.32 ccw(c6231.47,2812.32) v1@6223.08,2803.93 ; U61.69@6219.6,2821.97 ccw(c6241.12,2821.97) v1@6225.91,2806.76 ; v1@6358.47,3248.43 ccw(c6342.26,3264.64) 6365.19,3264.64 ccw(c6388.13,3264.64) v1@6371.91,3248.43 ; v1@6361.3,3245.6 ccw(c6351.91,3254.99) 6365.19,3254.99 ccw(c6378.47,3254.99) v1@6369.08,3245.6 ; v1(6365.19,3241.71) 6365.19,3283.37 6306.86,3341.71 6306.86,3475.04 6340.19,3508.37 6340.19,3624.04 6382.86,3666.71 6382.86,3752.04 6312.52,3822.37 ; 5855.29,3921.56 ccw(c5862.47,3928.74) 5862.47,3918.59 ; 5855.29,3921.56 ccw(c5862.47,3928.74) 5862.47,3918.59 ; 5855.29,3921.56 cw(c5867.83,3934.09) 5850.1,3934.09 ccw(c5867.83,3934.09) 5855.29,3921.56 ; 5855.29,3921.56 ccw(c5842.76,3909.03) 5842.76,3926.75 cw(c5842.76,3909.03) 5855.29,3921.56 ; 5862.47,3918.59 5910,3918.59 5920,3918.59 5969.58,3918.59 5978.15,3927.15 6021.75,3927.15 6029.52,3919.37 6031.19,3917.71 6032.02,3916.87 6032.02,3899.52 6045.5,3886.04 6045.5,3861.65 6057.94,3849.21 6065,3849.21 6072.44,3849.21 6082.69,3849.21 6106.86,3825.04 6106.86,3793.37 6115.19,3785.04 6133.04,3785.04 6144.5,3796.5 U13.13@6170.59,3796.5 ; U13.13@6170.59,3796.5 6202.07,3796.5 ; 6202.07,3796.5 6224.52,3774.04 6264.19,3774.04 6312.52,3822.37 ; 6206.15,4498.27 6225.21,4479.21 6252.69,4479.21 6273.52,4458.37 6298.52,4458.37 6342.52,4414.37 6342.52,4344.04 6331.86,4333.37 6327.86,4333.37 6298.52,4304.04 6298.52,4280.71 6323.52,4255.71 6323.52,4129.71 6290.19,4096.37 6290.19,3956.37 6306.86,3939.71 6306.86,3880.04 6326.52,3860.37 6326.52,3836.37 6312.52,3822.37
  MidLayer1 w4: v1@6212.47,2806.76 ccw(c6205.91,2813.32) 6215.19,2813.32 ccw(c6232.47,2813.32) v1@6220.25,2801.1 ; 6215.19,2822.98 ccw(c6242.13,2822.98) v1@6223.08,2803.93 ; 6215.19,2832.63 ccw(c6251.78,2832.63) v1@6225.91,2806.76 ; v1(6219.19,2800.04) 6215.19,2804.04 6215.19,3205.04 v1(6225.19,3215.04)
  Bottom Layer w4: v1(6225.19,3215.04) 6230.19,3215.04 6256.86,3241.71 v1(6365.19,3241.71) ; v1@6225.19,3216.54 ccw(c6225.19,3232.23) 6236.29,3221.14 ; v1@6225.19,3220.54 ccw(c6225.19,3245.89) 6243.11,3227.97 ; v1@6225.19,3224.54 ccw(c6225.19,3259.55) 6249.94,3234.79 ; v1@6234.69,3215.04 cw(c6245.55,3215.04) 6237.87,3222.72 ; v1@6358.47,3234.99 ccw(c6342.26,3218.77) 6342.26,3241.71 ccw(c6342.26,3264.64) v1@6358.47,3248.43 ; v1@6361.3,3237.82 ccw(c6351.91,3228.43) 6351.91,3241.71 ccw(c6351.91,3254.99) v1@6361.3,3245.6
DB_MEM.BUS_D24: U8.F25 U13.42 U17.29 U61.70 | length 4207.8
  Top Layer w4: v1@6109.52,4576.54 cw(c6109.52,4553.61) 6125.74,4569.82 cw(c6141.96,4586.04) v1@6119.02,4586.04 ; v1@6109.52,4580.54 cw(c6109.52,4567.26) 6118.91,4576.65 cw(c6128.3,4586.04) v1@6115.02,4586.04 ; v1(6109.52,4586.04) 6128.86,4566.71 6128.86,4530.04 6081.86,4483.04 6053.04,4483.04 6036.71,4466.71 6001.01,4466.71 5966.93,4500.78 5924.74,4500.78 5920,4500.78 5910,4500.78 5862.47,4500.78 ; U61.70@6197.09,2853.36 ccw(c6193.63,2856.82) 6198.52,2856.82 ; U61.70@6198.52,2841.71 6198.52,2916.71 6215.19,2933.37 6215.19,3074.04 6198.52,3090.71 6198.52,3150.04 6248.52,3200.04 6248.52,3217.71 v1(6313.19,3282.37) ; 6198.52,2863.56 ccw(c6212.95,2863.56) U61.70@6202.75,2853.36 ; v1@6303.69,3282.37 cw(c6280.76,3282.37) 6296.97,3266.16 cw(c6313.19,3249.94) v1@6313.19,3272.87 ; v1@6307.69,3282.37 cw(c6294.41,3282.37) 6303.8,3272.99 cw(c6313.19,3263.6) v1@6313.19,3276.87 ; v1@6318.81,3374.43 ccw(c6302.59,3390.64) 6325.52,3390.64 ccw(c6348.46,3390.64) v1@6332.24,3374.43 ; v1@6321.64,3371.6 ccw(c6312.25,3380.99) 6325.52,3380.99 ccw(c6338.8,3380.99) v1@6329.41,3371.6 ; v1(6325.52,3367.71) 6325.52,3410.37 6373.52,3458.37 6373.52,3636.04 6394.19,3656.71 6394.19,3768.37 v1(6387.52,3775.04) ; v1(6454.52,4498.04) 6467.52,4485.04 6467.52,4446.69 6457.52,4436.69 6457.52,4377.04 6457.52,4355 6457.52,4212.81 6439.86,4195.14 6439.86,3940.14 6514.86,3865.14 6514.86,3810.14 6533.29,3791.71 v1(6573.52,3791.71) ; v1@6566.81,3784.99 ccw(c6550.59,3768.77) 6550.59,3791.71 ccw(c6550.59,3814.64) v1@6566.81,3798.43 ; v1@6569.41,4491.49 cw(c6578.8,4482.1) 6578.8,4495.37 cw(c6578.8,4508.65) v1@6569.41,4499.26 ; v1@6569.64,3787.82 ccw(c6560.25,3778.43) 6560.25,3791.71 ccw(c6560.25,3804.99) v1@6569.64,3795.6 ; v1@6570.19,4500.04 v1(6565.52,4495.37) 6602.11,4495.37 U17.29@6605,4498.27 ; v1@6572.24,4488.66 cw(c6588.46,4472.44) 6588.46,4495.37 cw(c6588.46,4518.31) v1@6572.24,4502.09 ; v1@6574.58,3790.65 cw(c6588.7,3776.53) 6588.7,3796.5 ; v1@6575.55,4495.37 ccw(c6575.55,4524.57) U17.29@6596.19,4503.92 ; v1@6577.41,3787.82 cw(c6598.36,3766.87) U13.42@6598.36,3796.5 ; v1@6580.24,3784.99 cw(c6608.02,3757.21) U13.42@6608.02,3796.5 ; v1@6580.24,3798.43 ccw(c6584.9,3803.08) 6584.9,3796.5 ; 6585.21,4495.37 ccw(c6585.21,4514.91) U17.29@6599.02,4501.1 ; 6589.52,4495.37 cw(c6589.52,4485.94) U17.29@6596.19,4492.61 ; U13.42@6596.19,3790.84 ccw(c6582.54,3777.18) 6582.54,3796.5 ccw(c6582.54,3815.81) U13.42@6596.19,3802.15 ; U13.42@6619.41,3796.5 v1@6578.19,3796.5 ; 5855.29,4497.81 cw(c5862.47,4490.63) 5862.47,4500.78 ; 5855.29,4497.81 cw(c5862.47,4490.63) 5862.47,4500.78 ; 5855.29,4497.81 ccw(c5867.83,4485.28) 5850.1,4485.28 cw(c5867.83,4485.28) 5855.29,4497.81 ; 5855.29,4497.81 cw(c5842.76,4510.34) 5842.76,4492.62 ccw(c5842.76,4510.34) 5855.29,4497.81 ; v1(6573.52,3791.71) 6578.19,3796.37 v1@6578.19,3796.5 ; v1(6573.52,3791.71) 6573.52,3791.83 v1@6578.19,3796.5
  MidLayer1 w4: v1@6306.47,3289.09 ccw(c6290.26,3305.31) 6313.19,3305.31 ccw(c6336.13,3305.31) v1@6319.91,3289.09 ; v1@6309.3,3286.26 ccw(c6299.91,3295.65) 6313.19,3295.65 ccw(c6326.47,3295.65) v1@6317.08,3286.26 ; v1(6313.19,3282.37) 6313.19,3339.37 6325.52,3351.71 ; v1@6320.98,3359.37 cw(c6316.8,3351.71) 6325.52,3351.71 ; v1(6325.52,3367.71) 6325.52,3351.71 ; v1@6330.07,3359.37 ccw(c6334.25,3351.71) 6325.52,3351.71 ; v1(6454.52,4498.04) 6457.19,4495.37 v1(6565.52,4495.37) ; v1@6458.41,4501.93 ccw(c6474.24,4517.76) 6474.24,4495.37 ; v1@6461.24,4491.32 cw(c6471.02,4481.54) 6471.02,4495.37 ; v1@6461.24,4504.76 ccw(c6483.9,4527.41) 6483.9,4495.37 ; v1@6558.81,4488.66 ccw(c6542.59,4472.44) 6542.59,4495.37 ccw(c6542.59,4518.31) v1@6558.81,4502.09 ; v1@6561.64,4491.49 ccw(c6552.25,4482.1) 6552.25,4495.37 ccw(c6552.25,4508.65) v1@6561.64,4499.26
  MidLayer2 w4: v1(6109.52,4586.04) 6095.86,4572.37 6067.86,4572.37 6048.52,4591.71 6023.52,4591.71 6006.86,4575.04 6006.86,4475.04 6015.19,4466.71 6037.52,4466.71 6054.19,4483.37 6087.52,4483.37 6112.52,4508.37 6259.19,4508.37 6267.52,4516.71 6435.86,4516.71 v1(6454.52,4498.04) ; v1@6445.02,4498.04 ccw(c6422.09,4498.04) 6438.31,4514.26 ccw(c6454.52,4530.48) v1@6454.52,4507.54 ; v1@6449.02,4498.04 ccw(c6435.75,4498.04) 6445.14,4507.43 ccw(c6454.52,4516.82) v1@6454.52,4503.54
  Bottom Layer w4: v1@6387.52,3765.54 cw(c6387.52,3736.17) 6408.29,3756.94 ; v1@6387.52,3769.54 cw(c6387.52,3749.83) 6401.46,3763.77 ; v1(6387.52,3775.04) 6390.19,3775.04 6415.19,3750.04 6531.86,3750.04 v1(6573.52,3791.71) ; v1@6397.02,3775.04 ccw(c6413.52,3775.04) 6401.86,3763.37 ; v1@6564.02,3791.71 cw(c6541.09,3791.71) 6557.31,3775.49 cw(c6573.52,3759.27) v1@6573.52,3782.21 ; v1@6568.02,3791.71 cw(c6554.75,3791.71) 6564.14,3782.32 cw(c6573.52,3772.93) v1@6573.52,3786.21
DB_MEM.BUS_D25: U8.U20 U13.44 U17.30 U61.72 | length 4076.1
  Top Layer w4: U8.U20@5645.91,4044.7 cw(c5645.91,4026.6) 5658.71,4039.4 cw(c5671.51,4052.2) U8.U20@5653.41,4052.2 ; U8.U20@5645.91,4044.86 cw(c5645.91,4027.14) 5658.44,4039.67 cw(c5670.97,4052.2) U8.U20@5653.25,4052.2 ; U8.U20@5645.91,4052.2 v3(5665.59,4032.52) ; v1(6156.86,2934.71) 6161.19,2930.37 U61.72@6161.19,2850.04 ; U61.72@6157.72,2853.36 ccw(c6149.35,2861.73) 6161.19,2861.73 ; 6161.19,2858.64 ccw(c6168.66,2858.64) U61.72@6163.38,2853.36 ; v1(6397.19,3016.71) 6415.19,3016.71 ; v1@6405.03,3011.35 cw(c6415.19,3004.41) 6415.19,3016.71 ; v1@6405.03,3022.07 ccw(c6415.19,3029.01) 6415.19,3016.71 ; v1@6440.19,3848.87 cw(c6440.19,3825.94) 6456.41,3842.16 cw(c6472.63,3858.37) v1@6449.69,3858.37 ; v1@6440.19,3852.87 cw(c6440.19,3839.6) 6449.58,3848.99 cw(c6458.97,3858.37) v1@6445.69,3858.37 ; v1(6440.19,3858.37) 6498.52,3800.04 6498.52,3608.04 6406.86,3516.37 6406.86,3141.71 6423.52,3125.04 6423.52,3025.04 6415.19,3016.71 ; v1@6564.02,4094.37 ccw(c6541.09,4094.37) 6557.31,4110.59 ccw(c6573.52,4126.81) v1@6573.52,4103.87 ; v1@6568.02,4094.37 ccw(c6554.75,4094.37) 6564.13,4103.76 ccw(c6573.52,4113.15) v1@6573.52,4099.87 ; v1(6573.52,4094.37) 6531.86,4136.04 6531.86,4500.04 6557.42,4525.6 6558.52,4526.71 6561.58,4529.76 U17.30@6619.41,4529.76 ; U17.30@6596.19,4524.11 ccw(c6582.54,4510.45) 6582.54,4529.76 ccw(c6582.54,4549.08) U17.30@6596.19,4535.42 ; U13.44@6619.41,3859.49 6649.19,3859.49 ; U13.44@6644.3,3856.29 cw(c6649.19,3854.15) 6649.19,3859.49 ; U13.44@6644.3,3862.69 ccw(c6649.19,3864.82) 6649.19,3859.49 ; v1(6665.19,3858.37) 6650.3,3858.37 6649.19,3859.49 ; 5652.79,4045.32 cw(c5639.98,4032.52) 5658.09,4032.52 ccw(c5639.98,4032.52) 5652.79,4045.32 ; 5652.79,4045.32 ccw(c5665.59,4058.13) 5665.59,4040.02 cw(c5665.59,4058.13) 5652.79,4045.32
  MidLayer1 w4: v1@6398.52,3990.54 cw(c6398.52,3967.61) 6414.74,3983.82 cw(c6430.96,4000.04) v1@6408.02,4000.04 ; v1@6398.52,3994.54 cw(c6398.52,3981.26) 6407.91,3990.65 cw(c6417.3,4000.04) v1@6404.02,4000.04 ; v1(6398.52,4000.04) 6456.86,3941.71 6456.86,3875.04 v1(6440.19,3858.37) ; v1@6440.19,3863.87 ccw(c6440.19,3877.15) 6449.58,3867.76 ccw(c6458.97,3858.37) v1@6445.69,3858.37 ; v1@6440.19,3867.87 ccw(c6440.19,3890.81) 6456.41,3874.59 ccw(c6472.63,3858.37) v1@6449.69,3858.37
  MidLayer2 w4: v3@5666.24,4025.05 cw(c5667.82,4007.01) 5679.46,4020.88 cw(c5691.1,4034.75) v3@5673.06,4033.17 ; 5679.17,4021.13 ccw(c5689.1,4031.06) 5689.1,4017.01 5782.64,4017.01 5910,4017.01 5920,4017.01 6018.27,4017.01 6024.24,4011.04 6066.52,4011.04 6080.52,4025.04 6131.86,4025.04 6190.19,3966.71 6225.19,3966.71 6260.86,4002.37 6396.19,4002.37 v1(6398.52,4000.04)
  Bottom Layer w4: v1@6152.16,2942.97 ccw(c6147.57,2951.04) 6156.86,2951.04 ; v1(6156.86,2934.71) 6156.86,2951.04 ; v1@6161.55,2942.97 cw(c6166.15,2951.04) 6156.86,2951.04 ; v1@6390.47,3009.99 ccw(c6374.26,2993.77) 6374.26,3016.71 ccw(c6374.26,3039.64) v1@6390.47,3023.43 ; v1@6393.3,3012.82 ccw(c6383.91,3003.43) 6383.91,3016.71 ccw(c6383.91,3029.99) v1@6393.3,3020.6 ; v1(6397.19,3016.71) 6231.86,3016.71 6181.86,2966.71 6172.52,2966.71 6156.86,2951.04 ; v1(6398.52,4000.04) 6479.19,4000.04 v1(6573.52,4094.37) ; v1@6402.41,3996.15 cw(c6411.8,3986.76) 6411.8,4000.04 cw(c6411.8,4013.32) v1@6402.41,4003.93 ; v1@6405.24,3993.32 cw(c6421.46,3977.11) 6421.46,4000.04 cw(c6421.46,4022.98) v1@6405.24,4006.76 ; v1(6440.19,3858.37) 6490.19,3908.37 6581.86,3908.37 6631.86,3858.37 v1(6665.19,3858.37) ; v1@6440.19,3863.87 ccw(c6440.19,3877.15) 6449.58,3867.76 ccw(c6458.97,3858.37) v1@6445.69,3858.37 ; v1@6440.19,3867.87 ccw(c6440.19,3890.81) 6456.41,3874.59 ccw(c6472.63,3858.37) v1@6449.69,3858.37 ; v1@6564.02,4094.37 cw(c6541.09,4094.37) 6557.31,4078.16 cw(c6573.52,4061.94) v1@6573.52,4084.87 ; v1@6568.02,4094.37 cw(c6554.75,4094.37) 6564.14,4084.99 cw(c6573.52,4075.6) v1@6573.52,4088.87 ; v1@6658.47,3851.66 ccw(c6642.26,3835.44) 6642.26,3858.37 ccw(c6642.26,3881.31) v1@6658.47,3865.09 ; v1@6661.3,3854.49 ccw(c6651.91,3845.1) 6651.91,3858.37 ccw(c6651.91,3871.65) v1@6661.3,3862.26
DB_MEM.BUS_D26: U8.U22 U13.45 U17.31 U61.73 | length 3979.1
  Top Layer w4: U8.U22@5724.65,4044.7 cw(c5724.65,4026.6) 5737.45,4039.4 cw(c5750.25,4052.2) U8.U22@5732.15,4052.2 ; U8.U22@5724.65,4044.86 cw(c5724.65,4027.14) 5737.18,4039.67 cw(c5749.71,4052.2) U8.U22@5731.99,4052.2 ; U8.U22@5724.65,4052.2 v3(5744.33,4032.52) ; U61.73@6138.19,2821.17 cw(c6134.14,2816.68) 6140.19,2816.68 cw(c6144.49,2816.68) U61.73@6142.61,2820.55 ; U61.73@6140.19,2837.34 6140.19,2816.71 6148.52,2808.37 6165.19,2808.37 v1(6206.86,2766.71) ; U61.73@6140.86,2824.14 ccw(c6145.86,2820.11) 6141.32,2815.58 ; U61.73@6143.98,2821.63 ccw(c6149.34,2817.3) 6144.47,2812.43 ; v1@6197.36,2766.71 ccw(c6174.42,2766.71) 6190.64,2782.93 ccw(c6206.86,2799.14) v1@6206.86,2776.21 ; v1@6201.36,2766.71 ccw(c6188.08,2766.71) 6197.47,2776.1 ccw(c6206.86,2785.49) v1@6206.86,2772.21 ; v1@6571.76,3885.14 cw(c6585.86,3871.04) 6585.86,3890.98 ; v1(6573.52,3883.37) 6581.13,3890.98 U13.45@6619.41,3890.98 6675.98,3890.98 6695,3910 6695,4095.23 6688.52,4101.71 6688.52,4169.71 6681.86,4176.37 6666.52,4176.37 6662.52,4180.37 6662.52,4255.71 6690.19,4283.37 6690.19,4364 6698.52,4372.33 6698.52,4514.98 6652.24,4561.26 ; v1@6574.58,3882.31 cw(c6595.52,3861.38) U13.45@6595.52,3890.98 ; v1@6577.41,3879.49 cw(c6605.17,3851.73) U13.45@6605.17,3890.98 ; v1@6580.24,3876.66 cw(c6614.83,3842.07) U13.45@6614.83,3890.98 ; U13.45@6596.19,3885.33 ccw(c6582.54,3871.67) 6582.54,3890.98 ccw(c6582.54,3910.3) U13.45@6596.19,3896.64 ; U17.31@6619.41,4561.26 6652.24,4561.26 ; U13.45@6642.63,3885.33 cw(c6656.28,3871.67) 6656.28,3890.98 cw(c6656.28,3910.3) U13.45@6642.63,3896.64 ; U17.31@6643.54,4556.7 cw(c6652.24,4550.68) 6652.24,4561.26 ; U17.31@6643.54,4565.82 ccw(c6652.24,4571.84) 6652.24,4561.26 ; 5731.53,4045.32 cw(c5718.72,4032.52) 5736.83,4032.52 ccw(c5718.72,4032.52) 5731.53,4045.32 ; 5731.53,4045.32 ccw(c5744.33,4058.13) 5744.33,4040.02 cw(c5744.33,4058.13) 5731.53,4045.32
  MidLayer1 w4: v3@5744.98,4025.05 cw(c5746.56,4007.01) 5758.2,4020.88 ; 5757.91,4021.13 ccw(c5767.84,4031.06) 5767.84,4017.01 5861.38,4017.01 5910,4017.01 5920,4017.01 5997.99,4017.01 6010.5,4004.5 6063.11,4004.5 6064.48,4005.87 6142.81,4005.87 6170,3978.69 6170,3865 6205,3830 6229.25,3830 6240.19,3819.06 v1(6240.19,3791.71) 6265,3766.9 6265,3761.25 6290.19,3736.06 6290.19,3608.37 6273.52,3591.71 6190.19,3591.71 6173.52,3575.04 6173.52,3377.41 6182.19,3368.75 6182.19,3241.71 6206.86,3217.04 6206.86,2891.71 6198.52,2883.37 6198.52,2775.04 v1(6206.86,2766.71) ; 6198.52,2780.79 ccw(c6220.94,2780.79) v1@6205.09,2764.94 ; 6198.52,2790.45 ccw(c6230.6,2790.45) v1@6207.92,2767.77 ; 6198.52,2800.1 ccw(c6240.25,2800.1) v1@6210.75,2770.6 ; 6198.52,2809.76 ccw(c6249.91,2809.76) v1@6213.57,2773.43 ; v1@6233.47,3798.43 ccw(c6217.26,3814.64) 6240.19,3814.64 ccw(c6263.13,3814.64) v1@6246.91,3798.43 ; v1@6236.3,3795.6 ccw(c6226.91,3804.99) 6240.19,3804.99 ccw(c6253.47,3804.99) v1@6244.08,3795.6 ; v1@6240.19,3782.21 cw(c6240.19,3759.27) 6256.41,3775.49 cw(c6272.63,3791.71) v1@6249.69,3791.71 ; v1@6240.19,3786.21 cw(c6240.19,3772.93) 6249.58,3782.32 cw(c6258.97,3791.71) v1@6245.69,3791.71 ; 5758.2,4020.88 cw(c5769.84,4034.75) 5751.8,4033.17 ccw(c5769.84,4034.75) 5758.2,4020.88
  Bottom Layer w4: v1(6240.19,3791.71) 6265.19,3816.71 6448.52,3816.71 6465.19,3833.37 6523.52,3833.37 v1(6573.52,3883.37) ; v1@6240.19,3797.21 ccw(c6240.19,3810.49) 6249.58,3801.1 ccw(c6258.97,3791.71) v1@6245.69,3791.71 ; v1@6240.19,3801.21 ccw(c6240.19,3824.14) 6256.41,3807.93 ccw(c6272.63,3791.71) v1@6249.69,3791.71 ; v1@6564.02,3883.37 cw(c6541.09,3883.37) 6557.31,3867.16 cw(c6573.52,3850.94) v1@6573.52,3873.87 ; v1@6568.02,3883.37 cw(c6554.75,3883.37) 6564.14,3873.99 cw(c6573.52,3864.6) v1@6573.52,3877.87
DB_MEM.BUS_D27: U8.T20 U13.47 U17.32 U61.74 | length 4048.2
  Top Layer w4: U8.T20@5645.91,4084.07 cw(c5645.91,4065.97) 5658.71,4078.77 cw(c5671.51,4091.57) U8.T20@5653.41,4091.57 ; U8.T20@5645.91,4084.23 cw(c5645.91,4066.51) 5658.44,4079.04 cw(c5670.97,4091.57) U8.T20@5653.25,4091.57 ; U8.T20@5645.91,4091.57 v3(5665.59,4071.89) ; v1@6111.86,2940.54 cw(c6111.86,2917.61) 6128.07,2933.82 cw(c6144.29,2950.04) v1@6121.36,2950.04 ; v1@6111.86,2944.54 cw(c6111.86,2931.26) 6121.25,2940.65 cw(c6130.64,2950.04) v1@6117.36,2950.04 ; v1(6111.86,2950.04) 6152.86,2909.04 6152.86,2875.04 6144.52,2866.71 6129.18,2866.71 6121.18,2858.71 ; U61.74@6118.72,2853.69 ccw(c6114.82,2858.71) 6121.18,2858.71 ; U61.74@6121.18,2837.34 6121.18,2858.71 ; U61.74@6123.64,2853.69 cw(c6127.54,2858.71) 6121.18,2858.71 ; v1@6536.81,3990.99 ccw(c6520.59,3974.77) 6520.59,3997.71 ccw(c6520.59,4020.64) v1@6536.81,4004.43 ; v1@6539.64,3993.82 ccw(c6530.25,3984.43) 6530.25,3997.71 ccw(c6530.25,4010.99) v1@6539.64,4001.6 ; v1@6543.52,3988.21 cw(c6543.52,3965.27) 6559.74,3981.49 cw(c6575.96,3997.71) v1@6553.02,3997.71 ; v1@6543.52,3992.21 cw(c6543.52,3978.93) 6552.91,3988.32 cw(c6562.3,3997.71) v1@6549.02,3997.71 ; 6580.01,4591.71 ccw(c6580.01,4614.6) U17.32@6596.19,4598.41 ; 6585.07,4591.71 cw(c6585.07,4575.97) U17.32@6596.19,4587.1 ; 6589.66,4591.71 ccw(c6589.66,4604.94) U17.32@6599.02,4595.58 ; U13.47@6595.11,3949.67 ccw(c6587.26,3944.66) 6587.26,3953.98 ; U13.47@6595.11,3958.28 cw(c6587.26,3963.29) 6587.26,3953.98 ; U13.47@6619.41,3953.98 6587.26,3953.98 ; U17.32@6619.41,4592.76 6601.84,4592.76 6601.84,4591.71 6515.19,4591.71 6498.52,4575.04 6498.52,4493.35 6523.52,4468.35 6523.52,4191.71 6456.86,4125.04 6456.86,4025.04 6484.19,3997.71 v1(6543.52,3997.71) 6587.26,3953.98 ; 5652.79,4084.69 cw(c5639.98,4071.89) 5658.09,4071.89 ccw(c5639.98,4071.89) 5652.79,4084.69 ; 5652.79,4084.69 ccw(c5665.59,4097.5) 5665.59,4079.39 cw(c5665.59,4097.5) 5652.79,4084.69
  MidLayer1 w4: v1(6448.52,3108.37) 6490.19,3150.04 6490.19,3230.04 6506.86,3246.71 6506.86,3660.75 6515.19,3669.08 6515.19,3969.37 v1(6543.52,3997.71) ; v1@6448.52,3113.87 ccw(c6448.52,3127.15) 6457.91,3117.76 ccw(c6467.3,3108.37) v1@6454.02,3108.37 ; v1@6448.52,3117.87 ccw(c6448.52,3140.81) 6464.74,3124.59 ccw(c6480.96,3108.37) v1@6458.02,3108.37 ; v1@6534.02,3997.71 cw(c6511.09,3997.71) 6527.31,3981.49 cw(c6543.52,3965.27) v1@6543.52,3988.21 ; v1@6538.02,3997.71 cw(c6524.75,3997.71) 6534.13,3988.32 cw(c6543.52,3978.93) v1@6543.52,3992.21
  MidLayer2 w4: v3@5666.24,4064.42 cw(c5667.82,4046.38) 5679.46,4060.25 cw(c5691.1,4074.12) v3@5673.06,4072.54 ; 5679.17,4060.5 ccw(c5689.1,4070.43) 5689.1,4056.38 5782.64,4056.38 5910,4056.38 5920,4056.38 5945.38,4056.38 5964,4075 5980,4075 6007.5,4047.5 6055.06,4047.5 6060.86,4041.71 6149.52,4041.71 6172.86,4018.37 6379.19,4018.37 6394.19,4033.37 6507.86,4033.37 v1(6543.52,3997.71) ; v1@6534.02,3997.71 ccw(c6511.09,3997.71) 6527.31,4013.93 ccw(c6543.52,4030.14) v1@6543.52,4007.21 ; v1@6538.02,3997.71 ccw(c6524.75,3997.71) 6534.14,4007.1 ccw(c6543.52,4016.49) v1@6543.52,4003.21
  Bottom Layer w4: v1(6111.86,2950.04) 6131.86,2950.04 ; v1@6116.12,2946.57 cw(c6123.44,2940.6) 6123.44,2950.04 cw(c6123.44,2959.48) v1@6116.12,2953.52 ; v1@6119.22,2944.04 cw(c6131.86,2933.74) 6131.86,2950.04 ; v1@6119.22,2956.04 ccw(c6131.86,2966.34) 6131.86,2950.04 ; v1@6439.02,3108.37 cw(c6416.09,3108.37) 6432.31,3092.16 cw(c6448.52,3075.94) v1@6448.52,3098.87 ; v1@6443.02,3108.37 cw(c6429.75,3108.37) 6439.14,3098.99 cw(c6448.52,3089.6) v1@6448.52,3102.87 ; v1(6448.52,3108.37) 6432.19,3092.04 6180.29,3092.04 6165.19,3076.94 6165.19,2983.37 6131.86,2950.04